# EAGLE board UsbChargeAndStepUpConnector (EAGLE 8.0.1)
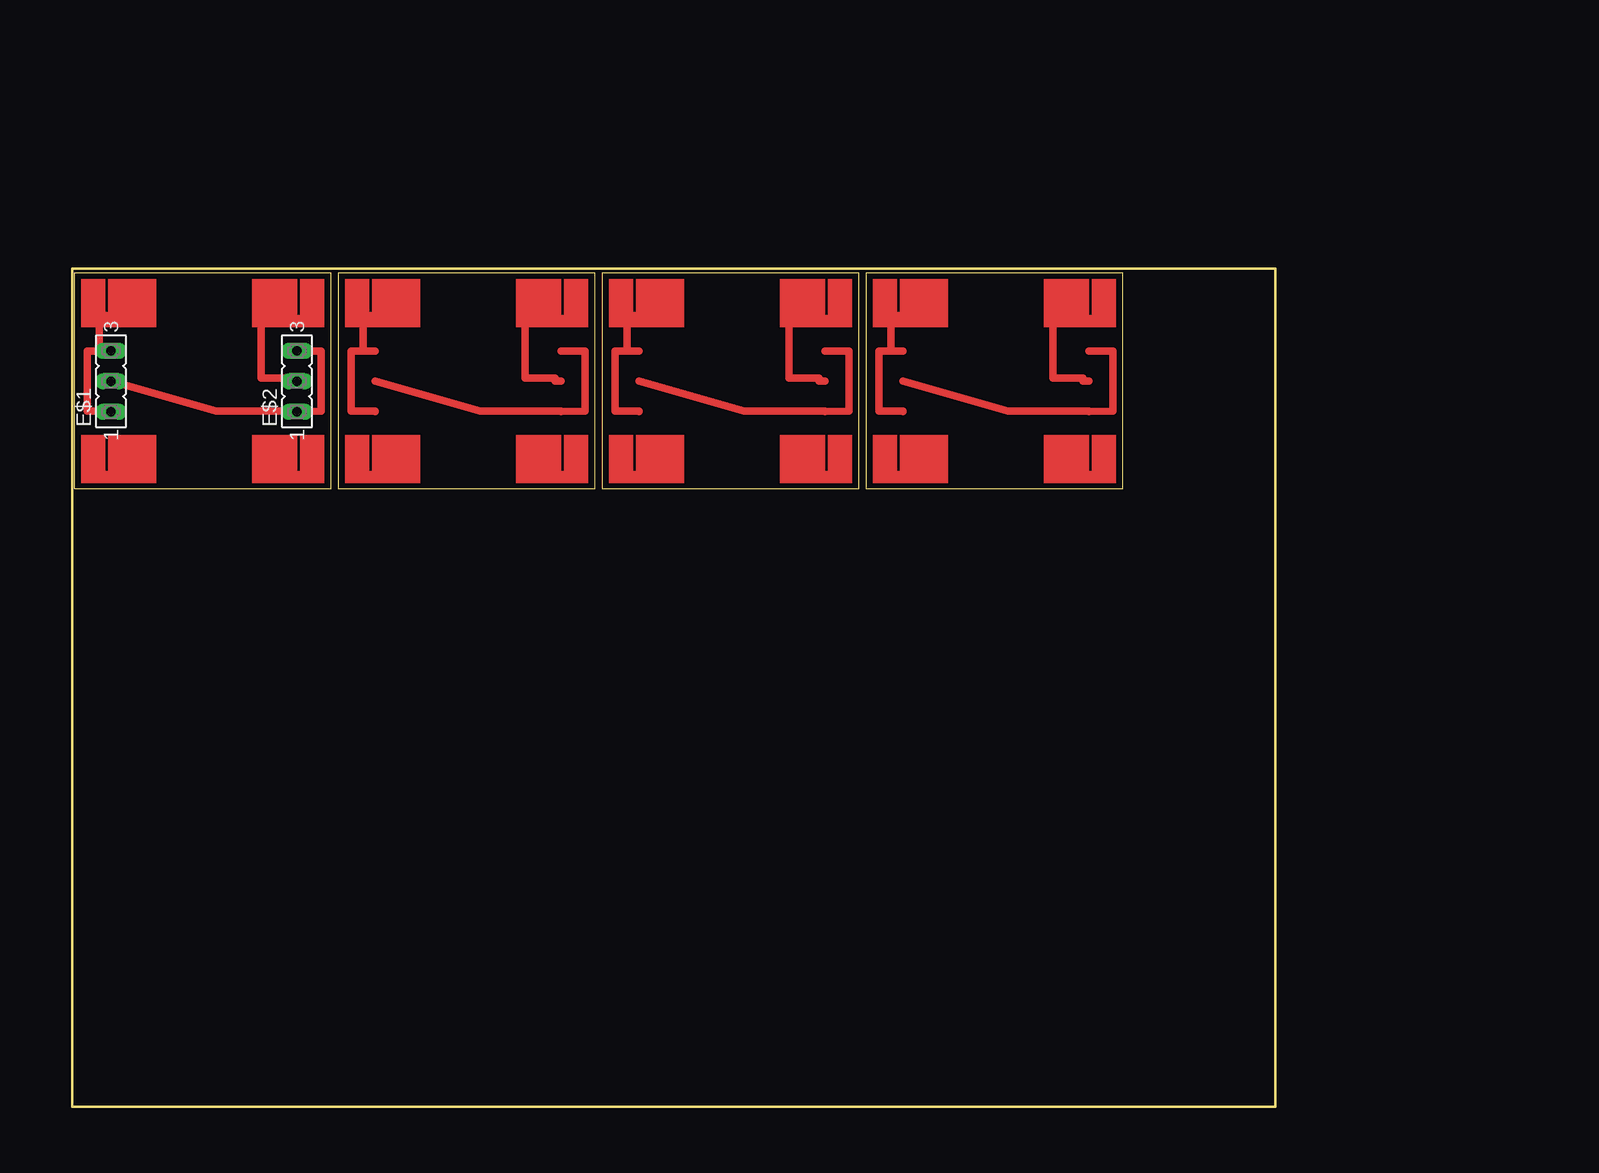
[diagram p0: board, top side]
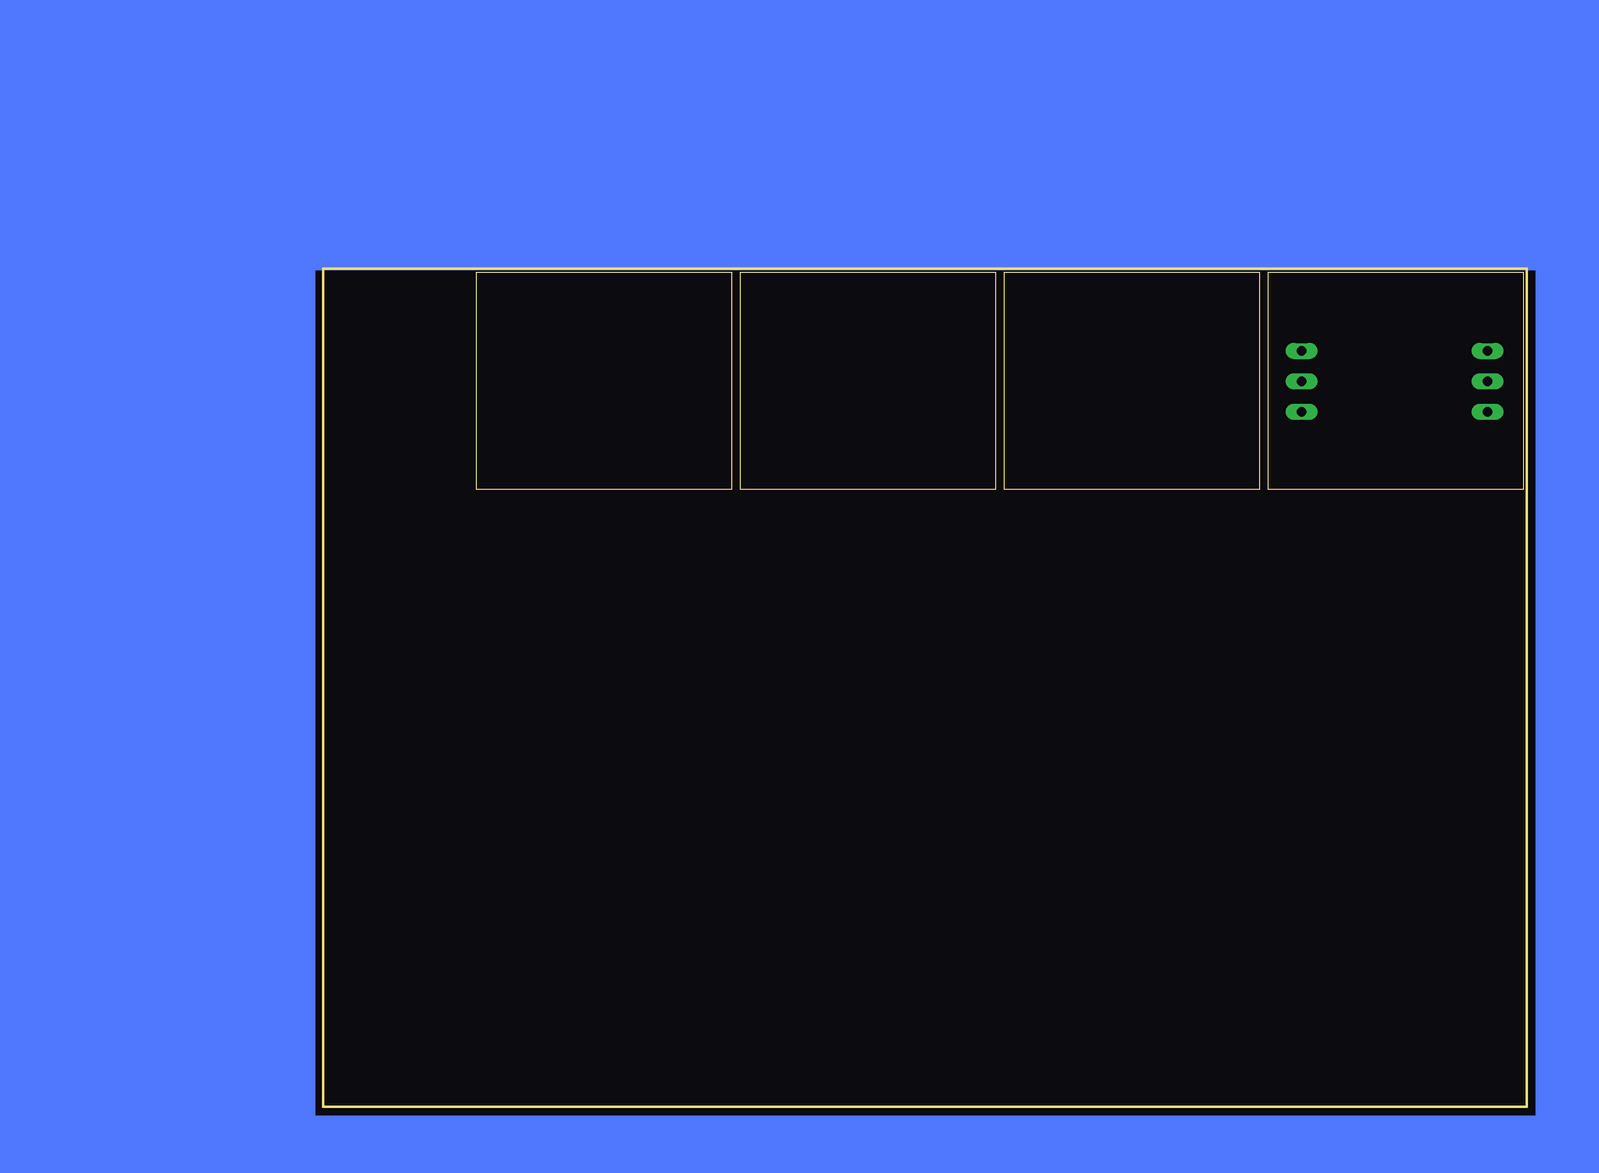
[diagram p1: board, bottom side, seen from below]

Size 100.33 x 69.85 mm. Coordinates in mm from the lower left corner, seen from the top.
Outline: 0,0 0,69.85 100.33,69.85 100.33,0 0,0
Outline: 0.22,69.51 21.58,69.51 21.58,51.48 0.22,51.48 0.22,69.51
Outline: 22.22,69.51 43.58,69.51 43.58,51.48 22.22,51.48 22.22,69.51
Outline: 44.22,69.51 65.58,69.51 65.58,51.48 44.22,51.48 44.22,69.51
Outline: 66.22,69.51 87.58,69.51 87.58,51.48 66.22,51.48 66.22,69.51
Copper layers (1*16): Top 0.035mm / dielectric 1.5mm / Bottom 0.035mm
Design rules "default": minimum track width 10mil, minimum drill 24mil, track to track 8mil, track to pad 8mil, pad to pad 8mil, via to via 8mil, smd to smd 8mil, copper to edge 40mil, drill to drill 8mil, minimum pad ring 10mil, minimum via ring 8mil, stop-mask expansion 4mil, vias tented up to drill 0mil, thermal gap 10mil

## Footprints (pad centres in the part's own frame; a part is rotated, then mirrored left to right if it is on the bottom)
FE03-1 = drill 0.813 long: 1 -5.08,0; 2 -2.54,0; 5 0,0

## Placement (x,y rotation side)
E$1  [FE03-1]  3.25,63 90 top
E$2  [FE03-1]  18.75,63 90 top

## Library data of the parts
E$1 E$2 = con-lsta

## Nets
S$2: E$1.1 E$1.5
S$3: E$1.2 E$2.1 E$2.5
S$4: E$2.2

## Tracks (layer width: path | path; a pad name or v marks a point on that pad's centre or on a via)
S$2
  Top 0.61: E$1.1 3.25,58 1.25,58 1.25,63 E$1.5 2.25,63 2.25,67.75
S$3
  Top 0.61: E$2.5 20.75,63 20.75,58 E$2.1 18.75,58 12,58 3.25,60.5 E$1.2
S$4
  Top 0.61: E$2.2 18.25,60.46 18.25,60.75 15.75,60.75 15.75,67.75 18.02,67.75 18.02,67.79
S$5
  Top 0.61: 4.05,67.75 4.05,67.79
S$7
  Top 0.61: 26.05,67.75 26.05,67.79
S$8
  Top 0.61: 25.25,57.92 25.25,58 23.25,58 23.25,63 25.25,63 24.25,63 24.25,67.75
S$9
  Top 0.61: 40.75,63 42.75,63 42.75,58 40.75,57.92 40.75,58 34,58 25.25,60.5 25.25,60.46
S$10
  Top 0.61: 40.75,60.46 40.25,60.46 40.25,60.75 37.75,60.75 37.75,67.75 40.02,67.75 40.02,67.79
S$11
  Top 0.61: 48.05,67.75 48.05,67.79
S$12
  Top 0.61: 47.25,57.92 47.25,58 45.25,58 45.25,63 47.25,63 46.25,63 46.25,67.75
S$13
  Top 0.61: 62.75,63 64.75,63 64.75,58 62.75,57.92 62.75,58 56,58 47.25,60.5 47.25,60.46
S$14
  Top 0.61: 62.75,60.46 62.25,60.46 62.25,60.75 59.75,60.75 59.75,67.75 62.02,67.75 62.02,67.79
S$15
  Top 0.61: 70.05,67.75 70.05,67.79
S$16
  Top 0.61: 69.25,57.92 69.25,58 67.25,58 67.25,63 69.25,63 68.25,63 68.25,67.75
S$17
  Top 0.61: 84.75,63 86.75,63 86.75,58 84.75,57.92 84.75,58 78,58 69.25,60.5 69.25,60.46
S$18
  Top 0.61: 84.75,60.46 84.25,60.46 84.25,60.75 81.75,60.75 81.75,67.75 84.02,67.75 84.02,67.79
(copper drawn outside any net)
  shapes: Bottom area x7, Top area x64

## Text on the board
tTest: in + | in-/B- | in + | in-/B- | in + | in-/B- | in + | in-/B- | sw1 | cb+ | sw1 | cb+ | sw1 | cb+ | sw1 | cb+ | sw2 | cb- | sw2 | cb- | sw2 | cb- | sw2 | cb- | b l | b+ | b l | b+ | b l | b+ | b l | b+ | Step up | Step up | Step up | Step up | out + | out - | out + | out - | out + | out - | out + | out -